# Altium PCB Power_MUX_PCB.PcbDoc (part 2 of 2)
Units mm, origin at the board's own origin, x right, y up, seen from the top; angles counter-clockwise.
Board outline 240.97 x 124.5 mm, 4 copper layers (Top Layer, Layer2_GND, Layer3_Inner, Bottom Layer 1), stack 1.548 mm thick; 112 components, 60 nets, 297 pads, 576 vias.
Unrouted connection lines stored in the file: 2.
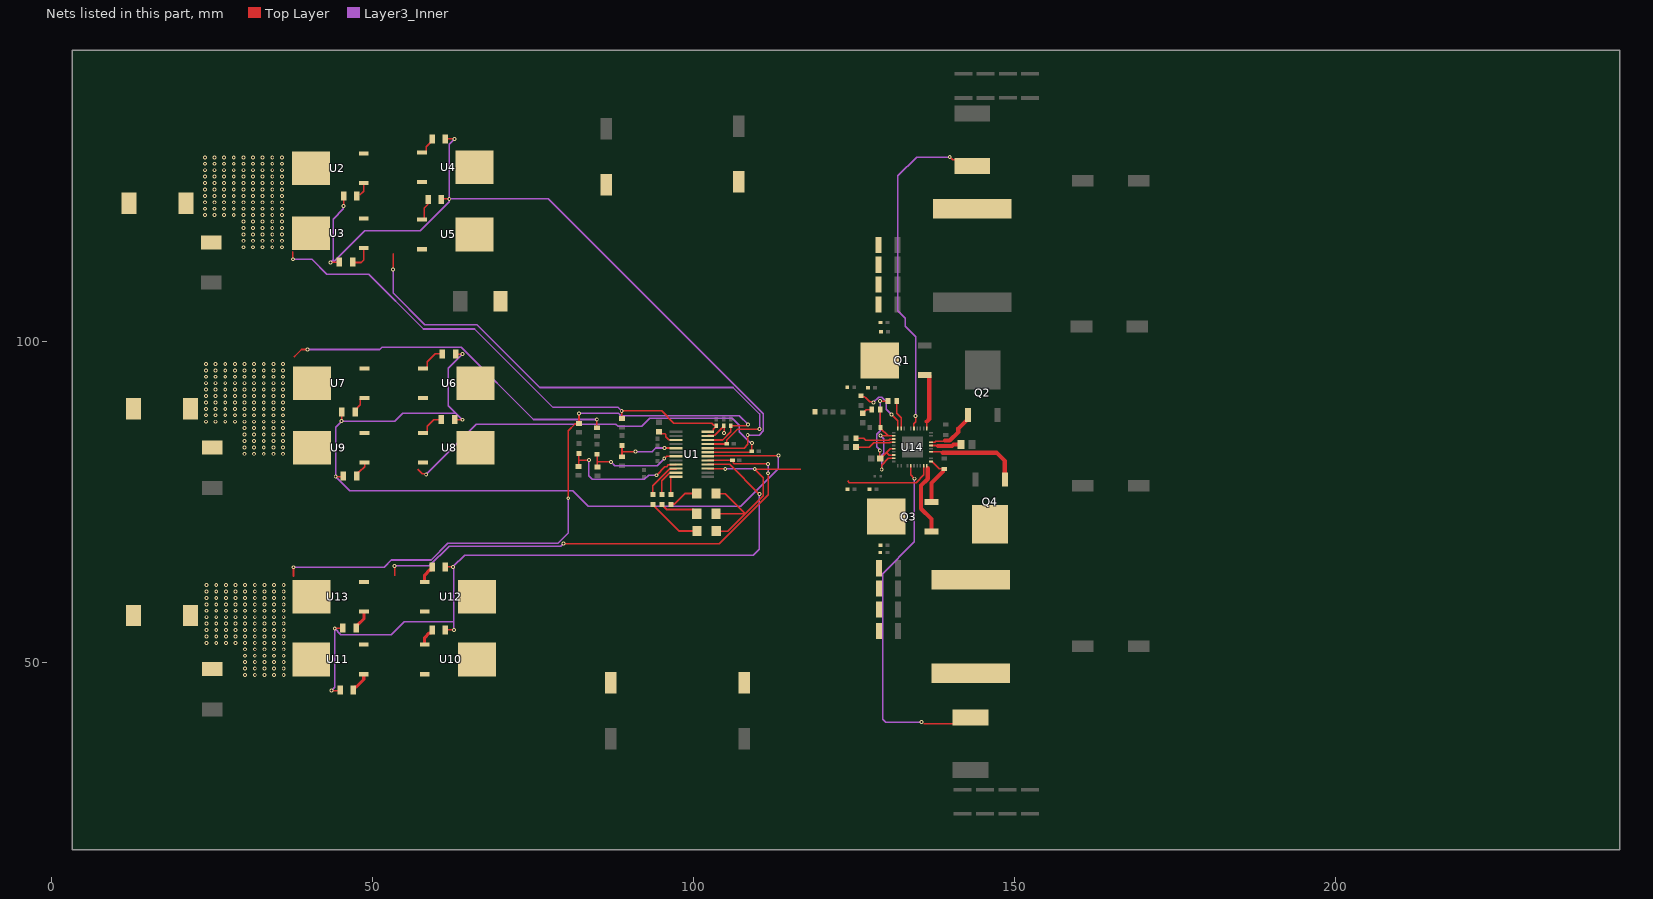
[diagram p4: the nets of this part, all layers, seen from the top]

## Via types
v1: diameter 0.6, hole 0.3, Top Layer to Bottom Layer 1, 567 vias
v2: diameter 0.6, hole 0.3, Top Layer to Bottom Layer 1, tented both sides, 9 vias

## Nets (pads, with @x,y where several pads share a name; then routed paths per layer and width w, separated by ;. In a path a pad name is that pad's centre, name@x,y a point inside that pad or via, vN(x,y) a via of type N, cw(c..) or ccw(c..) an arc to the next point about the centre after c; other vN are vias at no path point) (continued)
NetC_BOOT2_2: C_BOOT2.2 L2.1 Q3.3 Q4.2 U14.10 | length 8
  Top Layer w0.2: U14.10@136.999,81.3 137.174,81.3 138.273,80.201 138.995,80.201 C_BOOT2.2@139.074,80.122
  Top Layer w0.65: Q3.3@137.067,75.025 137.067,77.969 138.849,79.75
NetC_COMP_1: C_COMP.1 R_COMP.1 | length 1.7
  Top Layer w0.2: C_COMP.1@126.374,88.799 126.374,88.824 126.924,89.375 R_COMP.1@127.775,89.375
NetC_HF_1: C_HF.1 R_COMP.2 U14.28 U14.35 | length 15.3
  Top Layer w0.2: v1(129.124,85.325) 129.149,85.3 130.329,85.3 ; R_COMP.2@129.126,89.37 129.126,86.503 130.329,85.3 ; v1(129.324,80.05) 129.324,80.751 130.372,81.8 U14.35@131.199,81.8 ; U14.28@131.199,85.3 130.329,85.3
  Layer3_Inner w0.2: v1(129.124,85.325) 129.628,84.821 129.628,82.588 129.324,82.283 v1(129.324,80.05)
NetC_VCC_2: C_VCC.2 U14.14 | length 4.7
  Top Layer w0.25: U14.14@136.999,83.8 138.024,83.8
  Top Layer w0.65: 138.104,83.719 140.268,83.719 140.499,83.95 C_VCC.2@141.698,83.95
NetC_VS1_1: C_VS1.1 U1.21 U2.3 U3.3 U4.3 U5.3 | length 82.7
  Top Layer w0.254: v1(53.225,111.2) 53.225,113.625 ; U1.21@102.214,84.013 102.233,84.031 105.186,84.031 C_VS1.1@105.204,84.05 105.204,84.651 106.904,86.35 v1(110.3,86.35)
  Layer3_Inner w0.254: v1(53.225,111.2) 53.225,107.55 58.15,102.625 66.275,102.625 76.075,92.825 106.175,92.825 110.3,88.7 v1(110.3,86.35)
NetC_VS2_1: C_VS2.1 U1.19 U6.3 U7.3 U8.3 U9.3 | length 66.7
  Top Layer w0.2: 57.075,80.075 57.775,79.375 58.3,79.375 v1(58.375,79.3) ; U1.19@102.214,82.743 108.841,82.743 109.024,82.925 C_VS2.1@109.1,82.925 109.121,82.946 v1(109.121,84.2)
  Layer3_Inner w0.2: v1(58.375,79.3) 66.192,87.117 87.897,87.117 88.256,86.758 91.985,86.758 93.226,88 106.043,88 107.122,86.921 107.122,85.904 108.75,84.277 109.044,84.277 v1(109.121,84.2)
NetC_VS3_1: C_VS3.1 U1.17 U10.3 U11.3 U12.3 U13.3 | length 78.9
  Top Layer w0.2: v1(53.425,65.025) 53.45,65 53.45,63.525 ; v1(79.756,68.519) 103.983,68.519 111.625,76.161 v1(111.625,79.475) ; U1.17@102.214,81.473 102.228,81.486 106.066,81.486 C_VS3.1@106.079,81.5 106.186,81.394 106.186,81.096 106.361,80.921 111.621,80.921 v1(111.625,80.925)
  Layer3_Inner w0.2: v1(53.425,65.025) 58.831,65.025 61.928,68.122 79.305,68.122 79.702,68.519 v1(79.756,68.519) ; v1(111.625,79.475) v1(111.625,80.925)
NetD5_2: D5.2 R10.2 | length 8.6
  Top Layer w0.3: R10.2@93.675,74.596 93.697,74.596 97.819,70.475 D5.2@100.58,70.475
NetD6_2: D6.2 R11.2 | length 6.1
  Top Layer w0.3: R11.2@95.075,74.596 95.097,74.596 95.868,73.825 99.95,73.825 100.51,73.265 D6.2@100.51,73.175
NetD7_2: D7.2 R12.2 | length 4.7
  Top Layer w0.3: R12.2@96.5,74.596 96.579,74.675 97.045,74.675 98.67,76.3 D7.2@100.51,76.3
NetF1_1: F1.1
NetF2_1: F2.1
NetF3_1: F3.1
NetL1_2: L1.2 RS1.2 U14.22 | length 53.6
  Top Layer w0.2: U14.22@134.349,86.45 134.349,87.214 134.599,87.464 v1(134.599,88.4) ; v1@139.949,128.725 139.949,128.7 140.353,128.295 142.428,128.295 RS1.2@143.413,128.295
  Layer3_Inner w0.2: v1(134.599,88.4) 134.599,100.761 132.995,102.365 132.995,103.63 131.824,104.801 131.824,125.774 134.775,128.725 v1(139.924,128.725)
NetL2_2: L2.2 RS2.2 U14.4 | length 52.9
  Top Layer w0.2: U14.4@133.849,80.65 133.849,79.2 v1(134.424,78.625) ; 135.841,40.45 RS2.2@140.775,40.45
  Layer3_Inner w0.2: v1(134.424,78.625) 134.424,68.799 129.474,63.849 129.474,41.175 129.949,40.7 v1(135.524,40.7)
NetQ1_1: Q1.1 U14.18 | length 9.1
  Top Layer w0.25: U14.18@136.349,86.45 136.349,87.525
  Top Layer w0.65: Q1.1@136.017,94.75 136.579,94.75 136.724,94.605 136.724,87.9 136.349,87.525
NetQ2_1: Q2.1 U14.15 | length 8.2
  Top Layer w0.25: U14.15@136.999,84.3 137.604,84.3 137.754,84.45 139.054,84.45 139.174,84.569
  Top Layer w0.65: 139.174,84.569 139.916,84.569 141.26,85.913 141.26,86.438 142.749,87.927 Q2.1@142.749,88.531
NetQ3_1: Q3.1 U14.9 | length 10.9
  Top Layer w0.65: 136.499,80.25 136.499,78.602 135.469,77.572 135.469,73.94 137.067,72.341 Q3.1@137.067,70.425
NetQ4_1: Q4.1 U14.12 | length 14.9
  Top Layer w0.25: U14.12@136.999,82.8 138.699,82.8 138.824,82.675
  Top Layer w0.65: 138.824,82.675 147.199,82.675 148.499,81.375 Q4.1@148.499,78.519
NetR1_2: R1.2 R2.2 U1.5 | length 10.9
  Top Layer w0.2: 88.85,82.909 88.909,82.85 v1(90.95,82.85)
  Top Layer w0.3: R1.2@88.85,82.049 88.85,82.909 R2.2@88.85,83.769 R2.2@88.885,83.735 ; v1(95.475,83.4) 95.486,83.389 97.275,83.389 U1.5@97.286,83.378
  Layer3_Inner w0.25: v1(90.95,82.85) 93.596,82.85 93.863,83.118 ; 93.581,82.836 93.863,83.118 ; v1(95.475,83.4) 94.146,83.4 93.863,83.118
NetR4_2: R4.2 R5.2 U1.7 | length 15.2
  Top Layer w0.2: v1(95.45,81.75) 95.488,81.75 95.846,82.108 U1.7@97.286,82.108
  Top Layer w0.25: R5.2@85,82.422 85,81.3 ; R4.2@85.05,80.449 85,80.499 85,81.3 ; v1(87.15,81.25) 85.05,81.25 85,81.3
  Layer3_Inner w0.25: v1(87.15,81.25) 87.746,80.654 94.354,80.654 v1(95.45,81.75)
NetR7_2: R7.2 R8.2 U1.9 | length 20.9
  Top Layer w0.2: R7.2@82.125,80.524 82.15,80.549 82.15,81.559 ; R8.2@82.15,82.569 82.15,81.559 ; v1(83.725,81.525) 82.184,81.525 82.15,81.559 ; v1(94.257,79.162) 95.568,80.472 95.81,80.472 96.097,80.76 97.208,80.76 U1.9@97.286,80.838
  Layer3_Inner w0.2: v1(83.725,81.525) 83.725,79.05 84.25,78.525 92.367,78.525 93.003,79.162 v1(94.257,79.162)
NetR10_1: R10.1 U1.10 | length 6.1
  Top Layer w0.2: R10.1@93.675,76.152 93.675,77.525 94.9,78.75 94.9,78.774 96.251,80.125 97.208,80.125 U1.10@97.286,80.203
NetR11_1: R11.1 U1.11 | length 4.9
  Top Layer w0.2: R11.1@95.075,76.151 95.075,78.314 96.251,79.49 97.208,79.49 U1.11@97.286,79.568
NetR12_1: R12.1 U1.12 | length 3.5
  Top Layer w0.2: R12.1@96.5,76.152 96.5,78.855 96.578,78.933 U1.12@97.286,78.933
NetR13_1: R13.1 U3.1 | length 3.8
  Top Layer w0.25: R13.1@46.946,112.35 46.996,112.3 48.244,112.3 48.625,112.681 U3.1@48.625,114.575 ; U3.1@48.625,114.575 U3.1@48.7,114.575
NetR13_2: R13.2 R14.2 R15.2 R16.2 U1.20 | length 123.9
  Top Layer w0.2: v1(43.45,112.325) 44.824,112.325 R13.2@44.849,112.35 ; v1(45.5,121.1) 45.5,122.651 R14.2@45.524,122.675 ; R16.2@60.752,122.1 60.852,122.2 v1(61.975,122.2) ; R15.2@61.376,131.55 v1(62.8,131.55) ; U1.20@102.214,83.378 107.877,83.378 108.45,83.95 v1(108.45,85.425)
  Layer3_Inner w0.2: v1(45.5,121.1) 45.482,121.082 45.482,120.669 43.863,119.05 43.863,112.738 v1(43.45,112.325) 43.863,112.325 48.801,117.263 57.451,117.263 61.957,121.769 v1@61.957,122.182 ; v1(62.8,131.55) 61.975,130.725 v1(61.975,122.2) 77.404,122.2 110.9,88.704 110.9,86.101 110.224,85.425 v1(108.45,85.425)
NetR14_1: R14.1 U2.1 | length 2.1
  Top Layer w0.25: 48.075,122.85 48.625,123.4 U2.1@48.625,124.675
NetR15_1: R15.1 U4.1 | length 3
  Top Layer w0.2: U4.1@57.725,129.425 58.155,129.425 58.381,129.65 58.381,130.337 59.324,131.281 R15.1@59.324,131.55
NetR16_1: R16.1 U5.1 | length 2.6
  Top Layer w0.25: U5.1@58.072,118.975 58.072,120.797 58.6,121.325
NetR17_1: R17.1 U9.1 | length 2.6
  Top Layer w0.2: R17.1@47.526,79.075 47.526,79.344 47.855,79.674 47.949,79.674 48.775,80.5 U9.1@48.775,81.125
NetR17_2: R17.2 R18.2 R19.2 R20.2 U1.18 | length 130.8
  Top Layer w0.2: v1(44.275,78.95) 45.349,78.95 R17.2@45.474,79.075 ; v1(45.2,87.6) 45.2,88.976 R18.2@45.249,89.025 ; R20.2@62.801,87.825 62.826,87.8 v1(64.025,87.8) ; R19.2@62.951,98.075 63.001,98.025 v1(64.025,98.025) ; U1.18@102.214,82.108 102.273,82.166 113.166,82.166 v1(113.225,82.225)
  Layer3_Inner w0.2: v1(64.025,87.8) 63.001,88.824 ; v1(64.025,98.025) 61.825,95.825 61.825,90 63.001,88.824 ; v1(113.225,82.225) 113.225,80.2 107.349,74.324 83.633,74.324 81.182,76.775 46.45,76.775 v1(44.275,78.95) 44.275,86.675 v1(45.2,87.6) 53.489,87.6 54.712,88.824 63.001,88.824
NetR18_1: R18.1 U7.1 | length 3
  Top Layer w0.2: R18.1@47.301,89.025 47.301,89.295 48.119,90.113 48.119,90.975 48.345,91.2 U7.1@48.775,91.2
NetR19_1: R19.1 U6.1 | length 4.4
  Top Layer w0.2: U6.1@57.875,95.8 58.305,95.8 58.531,96.025 58.531,96.806 59.8,98.075 R19.1@60.899,98.075
NetR20_1: R20.1 U8.1 | length 4.2
  Top Layer w0.2: U8.1@57.875,85.725 58.305,85.725 58.531,85.95 58.531,86.756 59.55,87.775 60.699,87.775 R20.1@60.749,87.825
NetR21_1: R21.1 U13.1 | length 3.1
  Top Layer w0.5: R21.1@47.451,55.35 47.451,55.62 47.63,55.799 47.649,55.799 48.7,56.85 U13.1@48.7,57.925
NetR21_2: R21.2 R22.2 R23.2 R24.2 U1.16 | length 112.2
  Top Layer w0.2: v1(43.625,45.625) 44.873,45.625 R22.2@44.973,45.725 ; v1(44.125,55.3) 45.349,55.3 R21.2@45.399,55.35 ; R23.2@61.352,55.05 61.377,55.075 v1(62.7,55.075) ; R24.2@61.376,64.875 v1(62.525,64.875) ; U1.16@102.214,80.838 105.662,80.838 v1(110.275,76.225)
  Layer3_Inner w0.2: v1(43.625,45.625) v1(43.625,45.625) 44.125,46.127 v1(44.125,55.3) 45.073,54.352 52.96,54.352 54.922,56.313 62.7,56.313 ; v1(62.7,55.075) 62.7,56.313 ; v1(110.275,76.225) 110.275,67.65 109.35,66.725 64.375,66.725 v1(62.525,64.875) 62.525,64.767 62.7,64.592 62.7,56.313
NetR22_1: R22.1 U11.1 | length 3.3
  Top Layer w0.5: R22.1@47.025,45.725 47.025,45.994 47.204,46.173 47.474,46.173 48.65,47.35 U11.1@48.65,48.175
NetR23_1: R23.1 U10.1 | length 2.9
  Top Layer w0.5: U10.1@58.125,52.775 58.125,53.85 58.876,54.601 59.121,54.601 59.3,54.781 R23.1@59.3,55.05
NetR24_1: R24.1 U12.1 | length 3
  Top Layer w0.5: U12.1@58.125,62.525 58.125,63.6 58.951,64.427 59.145,64.427 59.324,64.606 R24.1@59.324,64.875
NetR_CFNG_2: R_CFNG.2 U14.26 | length 9.9
  Top Layer w0.2: R_CFNG.2@126.1,91.553 126.229,91.424 126.624,91.424 126.8,91.248 127.472,90.577 127.948,90.577 v1(128.025,90.5) ; v1(130.865,88.621) 131.849,87.637 U14.26@131.849,86.45
  Layer3_Inner w0.2: v1(128.025,90.5) 128.025,90.525 128.825,91.325 129.322,91.325 130.055,90.592 130.055,89.43 v1(130.865,88.621)
NetR_FB_1: R_FB.1 U14.25 | length 4.6
  Top Layer w0.2: R_FB.1@131.647,90.75 131.647,88.854 132.349,88.152 U14.25@132.349,86.45
NetR_HYS_2: R_HYS.2 U1.3 | length 3.4
  Top Layer w0.25: R_HYS.2@94.65,85.9 94.932,85.619 95.556,85.619 95.674,85.501 95.674,85.155 96.154,84.675 97.258,84.675 U1.3@97.286,84.648
NetR_RT_1: R_RT.1 U14.30 | length 6.2
  Top Layer w0.2: R_RT.1@125.323,83.55 127.374,83.55 128.068,84.244 130.613,84.244 130.669,84.3 U14.30@131.199,84.3
NetR_SS_2: R_SS.2 U14.29 | length 6.1
  Top Layer w0.2: R_SS.2@125.301,84.925 126.524,84.925 126.804,84.644 130.448,84.644 130.603,84.8 U14.29@131.199,84.8
VBAT1: CV1.2 D1.1 F1.2 R3.2 U1.24 U2.2 U3.2 | length 81
  Top Layer w0.2: v1(88.825,89.175) 95.053,89.175 96.953,87.275 102.848,87.275 103.157,86.967 103.454,86.967 CV1.2@103.56,86.86 103.56,86.784 103.104,86.328 103.104,85.995 103.027,85.918 U1.24@102.214,85.918
  Top Layer w0.254: 37.6,113.975 37.6,112.825 v1(37.625,112.8) ; v1(88.825,89.175) 88.825,88.023 R3.2@88.85,87.998
  Layer3_Inner w0.254: v1(37.625,112.8) 40.575,112.8 42.9,110.475 49.425,110.475 57.95,101.95 65.9,101.95 78.125,89.725 88.275,89.725 v1(88.825,89.175)
  other v1: 29.9,114.675 31.4,114.675 32.9,114.675 34.4,114.675 35.9,114.675 29.9,115.675 31.4,115.675 32.9,115.675 34.4,115.675 35.9,115.675 29.9,116.675 31.4,116.675 32.9,116.675 34.4,116.675 35.9,116.675 29.9,117.675 31.4,117.675 32.9,117.675 34.4,117.675 35.9,117.675 29.9,118.675 31.4,118.675 32.9,118.675 34.4,118.675 35.9,118.675 23.9,119.675 25.4,119.675 26.9,119.675 28.4,119.675 29.9,119.675 31.4,119.675 32.9,119.675 34.4,119.675 35.9,119.675 23.9,120.675 25.4,120.675 26.9,120.675 28.4,120.675 29.9,120.675 31.4,120.675 32.9,120.675 34.4,120.675 35.9,120.675 23.9,121.675 25.4,121.675 26.9,121.675 28.4,121.675 29.9,121.675 31.4,121.675 32.9,121.675 34.4,121.675 35.9,121.675 23.9,122.675 25.4,122.675 26.9,122.675 28.4,122.675 29.9,122.675 31.4,122.675 32.9,122.675 34.4,122.675 35.9,122.675 23.9,123.675 25.4,123.675 26.9,123.675 28.4,123.675 29.9,123.675 31.4,123.675 32.9,123.675 34.4,123.675 35.9,123.675 23.9,124.675 25.4,124.675 26.9,124.675 28.4,124.675 29.9,124.675 31.4,124.675 32.9,124.675 34.4,124.675 35.9,124.675 23.9,125.675 25.4,125.675 26.9,125.675 28.4,125.675 29.9,125.675 31.4,125.675 32.9,125.675 34.4,125.675 35.9,125.675 23.9,126.675 25.4,126.675 26.9,126.675 28.4,126.675 29.9,126.675 31.4,126.675 32.9,126.675 34.4,126.675 35.9,126.675 23.9,127.675 25.4,127.675 26.9,127.675 28.4,127.675 29.9,127.675 31.4,127.675 32.9,127.675 34.4,127.675 35.9,127.675 23.9,128.675 25.4,128.675 26.9,128.675 28.4,128.675 29.9,128.675 31.4,128.675 32.9,128.675 34.4,128.675 35.9,128.675
VBAT2: CV2.2 D2.1 F2.2 R6.2 U1.23 U7.2 U9.2 | length 58.1
  Top Layer w0.2: U1.23@102.214,85.283 102.292,85.36 103.326,85.36 104.571,86.605 104.571,86.7 CV2.2@104.75,86.879 104.762,86.867 104.762,85.763 v1(104.775,85.75)
  Top Layer w0.254: 37.85,97.65 38.95,98.75 v1(39.9,98.75) ; v1(84.95,87.85) 84.95,86.623 R6.2@85,86.573
  Layer3_Inner w0.254: v1(39.9,98.75) 51.125,98.75 51.475,99.101 63.836,99.101 75.087,87.85 v1(84.95,87.85)
  other v1: 30.075,82.5 31.575,82.5 33.075,82.5 34.575,82.5 36.075,82.5 30.075,83.5 31.575,83.5 33.075,83.5 34.575,83.5 36.075,83.5 30.075,84.5 31.575,84.5 33.075,84.5 34.575,84.5 36.075,84.5 30.075,85.5 31.575,85.5 33.075,85.5 34.575,85.5 36.075,85.5 30.075,86.5 31.575,86.5 33.075,86.5 34.575,86.5 36.075,86.5 24.075,87.5 25.575,87.5 27.075,87.5 28.575,87.5 30.075,87.5 31.575,87.5 33.075,87.5 34.575,87.5 36.075,87.5 24.075,88.5 25.575,88.5 27.075,88.5 28.575,88.5 30.075,88.5 31.575,88.5 33.075,88.5 34.575,88.5 36.075,88.5 24.075,89.5 25.575,89.5 27.075,89.5 28.575,89.5 30.075,89.5 31.575,89.5 33.075,89.5 34.575,89.5 36.075,89.5 24.075,90.5 25.575,90.5 27.075,90.5 28.575,90.5 30.075,90.5 31.575,90.5 33.075,90.5 34.575,90.5 36.075,90.5 24.075,91.5 25.575,91.5 27.075,91.5 28.575,91.5 30.075,91.5 31.575,91.5 33.075,91.5 34.575,91.5 36.075,91.5 24.075,92.5 25.575,92.5 27.075,92.5 28.575,92.5 30.075,92.5 31.575,92.5 33.075,92.5 34.575,92.5 36.075,92.5 24.075,93.5 25.575,93.5 27.075,93.5 28.575,93.5 30.075,93.5 31.575,93.5 33.075,93.5 34.575,93.5 36.075,93.5 24.075,94.5 25.575,94.5 27.075,94.5 28.575,94.5 30.075,94.5 31.575,94.5 33.075,94.5 34.575,94.5 36.075,94.5 24.075,95.5 25.575,95.5 27.075,95.5 28.575,95.5 30.075,95.5 31.575,95.5 33.075,95.5 34.575,95.5 36.075,95.5 24.075,96.5 25.575,96.5 27.075,96.5 28.575,96.5 30.075,96.5 31.575,96.5 33.075,96.5 34.575,96.5 36.075,96.5
VBAT3: CV3.2 D3.1 F3.2 R9.2 U1.22 U11.2 U13.2 | length 101
  Top Layer w0.254: 37.7,63.475 v1(37.7,64.825) ; v1(80.5,75.575) 80.5,86.099 81.545,87.144 82.071,87.144 R9.2@82.15,87.223 82.175,87.248 v1(82.175,88.8) ; U1.22@102.214,84.648 104.559,84.648 105.825,85.913 CV3.2@105.825,86.879 108.261,86.879 108.431,87.05 v1(108.525,87.05)
  Layer3_Inner w0.254: v1(37.7,64.825) 51.825,64.825 52.95,65.95 59.152,65.95 61.751,68.549 78.899,68.549 80.5,70.15 v1(80.5,75.575) ; v1(82.175,88.8) 88.313,88.8 88.686,88.427 107.148,88.427 v1(108.525,87.05)
  other v1: 30.175,48.05 31.675,48.05 33.175,48.05 34.675,48.05 36.175,48.05 30.175,49.05 31.675,49.05 33.175,49.05 34.675,49.05 36.175,49.05 30.175,50.05 31.675,50.05 33.175,50.05 34.675,50.05 36.175,50.05 30.175,51.05 31.675,51.05 33.175,51.05 34.675,51.05 36.175,51.05 30.175,52.05 31.675,52.05 33.175,52.05 34.675,52.05 36.175,52.05 24.175,53.05 25.675,53.05 27.175,53.05 28.675,53.05 30.175,53.05 31.675,53.05 33.175,53.05 34.675,53.05 36.175,53.05 24.175,54.05 25.675,54.05 27.175,54.05 28.675,54.05 30.175,54.05 31.675,54.05 33.175,54.05 34.675,54.05 36.175,54.05 24.175,55.05 25.675,55.05 27.175,55.05 28.675,55.05 30.175,55.05 31.675,55.05 33.175,55.05 34.675,55.05 36.175,55.05 24.175,56.05 25.675,56.05 27.175,56.05 28.675,56.05 30.175,56.05 31.675,56.05 33.175,56.05 34.675,56.05 36.175,56.05 24.175,57.05 25.675,57.05 27.175,57.05 28.675,57.05 30.175,57.05 31.675,57.05 33.175,57.05 34.675,57.05 36.175,57.05 24.175,58.05 25.675,58.05 27.175,58.05 28.675,58.05 30.175,58.05 31.675,58.05 33.175,58.05 34.675,58.05 36.175,58.05 24.175,59.05 25.675,59.05 27.175,59.05 28.675,59.05 30.175,59.05 31.675,59.05 33.175,59.05 34.675,59.05 36.175,59.05 24.175,60.05 25.675,60.05 27.175,60.05 28.675,60.05 30.175,60.05 31.675,60.05 33.175,60.05 34.675,60.05 36.175,60.05 24.175,61.05 25.675,61.05 27.175,61.05 28.675,61.05 30.175,61.05 31.675,61.05 33.175,61.05 34.675,61.05 36.175,61.05 24.175,62.05 25.675,62.05 27.175,62.05 28.675,62.05 30.175,62.05 31.675,62.05 33.175,62.05 34.675,62.05 36.175,62.05
VBUS: C4.1 C5.1 C6.1 C7.1 C20.2 C21.2 C22.2 C23.2 C24.1 C25.1 C26.1 C27.1 C28.1 C29.1 C30.1 C31.1 C32.2 C33.2 C34.2 C35.2 D4.1 D5.1 D6.1 D7.1 Q1.2 Q3.2 R26.2 U1.15 U4.2 U5.2 U6.2 U8.2 U10.2 U12.2 U14.8 | length 53.2
  Top Layer w0.2: U1.15@102.214,80.203 102.24,80.176 104.924,80.176 v1(104.95,80.15) ; D6.1@103.49,73.175 108.074,73.175 ; D7.1@103.49,76.3 104.949,76.3 108.074,73.175 ; D5.1@103.56,70.475 105.374,70.475 108.074,73.175 ; 116.75,80.125 v1(109.55,80.125) 110.875,78.8 110.875,75.976 108.074,73.175 ; 124,78.275 124.25,78.025 134.672,78.025 135.849,79.201 U14.8@135.849,80.65
  Layer3_Inner w0.2: v1(104.95,80.15) 104.963,80.138 109.537,80.138 v1(109.55,80.125)
VDDA: C_VDDA.1 R_FB.2 U14.32 U14.34 | length 14.7
  Top Layer w0.2: v1(129.028,83.025) 129.028,81.842 C_VDDA.1@129.124,81.746 129.149,81.746 129.524,82.121 129.524,82.146 130.1,82.723 ; v1(129.074,90.725) 130.275,90.725 R_FB.2@130.3,90.75 ; U14.34@131.199,82.3 130.499,82.3 130.1,82.698 130.1,82.723 ; U14.32@131.199,83.3 130.677,83.3 130.1,82.723
  Layer3_Inner w0.2: v1(129.028,83.025) 129.028,83.096 128.524,83.6 128.524,85.574 128.825,85.875 128.872,85.875 129.074,86.077 v1(129.074,90.725)
pads on no net: U1.1 U1.2 U1.14 U14.5 U14.21 U14.33

## Polygon pours and split planes (outlines as drawn)
GND on Top Layer "NONET_L-01_P-001" (solid, pour order 130): 170.525,51.545 170.525,50.526 173.25,50.526 173.25,51.525 173.25,54.475 170.525,54.475 170.525,53.452 170.194,53.452 170.194,51.547
GND on Top Layer "NONET_L-01_P-001" (solid, pour order 129): 170.525,76.545 170.525,75.526 173.25,75.526 173.25,76.525 173.25,79.475 170.525,79.475 170.525,78.452 170.194,78.452 170.194,76.547
GND on Top Layer "NONET_L-01_P-001" (solid, pour order 128): 170.3,101.37 170.3,100.351 173.025,100.351 173.025,101.35 173.025,104.3 170.3,104.3 170.3,103.277 169.969,103.277 169.969,101.372
GND on Top Layer "NONET_L-01_P-001" (solid, pour order 127): 170.525,124.045 170.525,123.026 173.25,123.026 173.25,124.025 173.25,126.975 170.525,126.975 170.525,125.952 170.194,125.952 170.194,124.047
VBUS on Top Layer "VBUS" (solid, pour order 91): 127.255,93.029 127.509,93.029 127.509,92.521 126.779,92.521 125.925,93.375 124.05,93.375 124.05,76.3 126.525,76.3 126.525,77.35 127.48,77.35 127.48,77.229 127.734,77.229 127.734,76.721 127.48,76.721 127.48,76.3 133,76.3 133,69.25 129.25,69.25 129.25,44.9 68.525,44.9 68.4,44.775 68.4,130.325 68.35,130.375 129.25,130.47 129.25,100.625 132,100.625 132,93.7 126.3,93.7 126.625,93.375 127.255,93.375
GND on Top Layer "NONET_L-01_P-001" (solid, pour order 126): 153.822,141.4 151.028,141.4 151.025,141.403 151.025,143.3 153.8,143.3 153.822,143.278
GND on Top Layer "NONET_L-01_P-001" (solid, pour order 122): 143.472,141.4 140.678,141.4 140.675,141.403 140.675,143.3 143.45,143.3 143.472,143.278
GND on Top Layer "NONET_L-01_P-001" (solid, pour order 123): 146.922,141.4 144.128,141.4 144.125,141.403 144.125,143.3 146.9,143.3 146.922,143.278
GND on Top Layer "NONET_L-01_P-001" (solid, pour order 124): 150.372,141.425 147.578,141.425 147.575,141.428 147.575,143.325 150.35,143.325 150.372,143.303
GND on Top Layer "NONET_L-01_P-001" (solid, pour order 121): 151.053,26.7 153.847,26.7 153.85,26.697 153.85,24.8 151.075,24.8 151.053,24.822
GND on Top Layer "NONET_L-01_P-001" (solid, pour order 120): 147.528,26.7 150.322,26.7 150.325,26.697 150.325,24.8 147.55,24.8 147.528,24.822
GND on Top Layer "NONET_L-01_P-001" (solid, pour order 119): 144.003,26.7 146.797,26.7 146.8,26.697 146.8,24.8 144.025,24.8 144.003,24.822
GND on Top Layer "NONET_L-01_P-001" (solid, pour order 118): 140.478,26.7 143.272,26.7 143.275,26.697 143.275,24.8 140.5,24.8 140.478,24.822
NetC8_2 on Top Layer "NONET_L-01_P-001" (solid, pour order 113): 147.35,135.675 147.35,125.675 154.125,125.675 154.125,43 147.225,43 147.225,33.012 147.237,33 140.375,33 140.375,30.025 161.475,30.025 161.475,138.05 140.625,138.05 140.625,135.675
NetL2_2 on Top Layer "NONET_L-01_P-001" (solid, pour order 87): 140.411,41.278 145.999,41.278 145.999,43.625 149.305,46.931 149.305,49.736 137.28,49.736 137.28,46.756 140.411,43.625
NetC_BOOT2_2 on Top Layer "NONET_L-01_P-001" (solid, pour order 81): 148.999,68.85 148.999,68.5 148.999,63.3 137.15,63.3 137.15,68.856 137.849,69.65 137.849,74.9 137.824,75.8 148.999,75.8
AGND on Top Layer "NONET_L-01_P-001" (solid, pour order 38): 128.399,78.775 128.399,90.2 123.049,90.2 123.049,78.775
GND on Top Layer "NONET_L-01_P-001" (solid, pour order 109): 86.195,36.95 85.176,36.95 85.176,34.225 86.175,34.225 89.125,34.225 89.125,36.95 88.102,36.95 88.102,37.281 86.197,37.281
GND on Top Layer "NONET_L-01_P-001" (solid, pour order 110): 106.945,36.95 105.926,36.95 105.926,34.225 106.925,34.225 109.875,34.225 109.875,36.95 108.852,36.95 108.852,37.281 106.947,37.281
NetC_VS2_1 on Top Layer "NONET_L-01_P-001" (solid, pour order 33): 49.35,79.825 49.35,82.087 49.35,90.35 49.35,92.15 49.35,96.75 57.217,96.75 57.262,86.637 57.262,84.626 57.325,84.562 57.325,79.825
VBAT2 on Top Layer "NONET_L-01_P-001" (solid, pour order 57): 28.495,84.548 28.475,84.527 28.475,80.825 32.168,80.825 38.125,80.825 38.125,97.998 22.07,97.998 22.07,85.535 23.444,84.161 26.746,84.161 26.745,84.162 26.745,84.548
GND on Top Layer "NONET_L-01_P-001" (solid, pour order 96): 23.424,78.344 26.726,78.344 26.726,76.312 26.725,76.311 26.725,72.775 23.45,72.775 23.425,72.75 23.424,72.751
GND on Top Layer "NONET_L-01_P-001" (solid, pour order 108): 107.98,134.725 108.999,134.725 108.999,137.45 108,137.45 105.05,137.45 105.05,134.725 106.073,134.725 106.073,134.394 107.978,134.394
GND on Top Layer "NONET_L-01_P-001" (solid, pour order 101): 87.355,134.3 88.374,134.3 88.374,137.025 87.375,137.025 84.425,137.025 84.425,134.3 85.447,134.3 85.447,133.969 87.352,133.969
GND on Top Layer "NONET_L-01_P-001" (solid, pour order 99): 64.819,107.901 64.819,104.599 62.787,104.599 62.786,104.6 59.25,104.6 59.25,107.875 59.225,107.9 59.226,107.901
NetC_BOOT1_2 on Top Layer "NONET_L-01_P-001" (solid, pour order 75): 136.741,105.185 136.741,101.833 136.741,96.975 149.517,96.975 149.517,105.185 137.224,105.185
GND on Top Layer "NONET_L-01_P-001" (solid, pour order 83): 144.499,87.7 144.499,84.975 149.249,84.975 149.249,87.7
GND on Top Layer "NONET_L-01_P-001" (solid, pour order 84): 141.449,82.05 141.449,79.325 146.199,79.325 146.199,82.05
NetL1_2 on Top Layer "NONET_L-01_P-001" (solid, pour order 86): 137.328,122.036 137.328,119.166 137.277,119.115 149.57,119.115 149.57,121.985 146.218,125.338 146.218,127.694 146.224,127.7 140.624,127.7 140.63,126.259 140.63,125.338
VBAT1 on Top Layer "NONET_L-01_P-001" (solid, pour order 27): 28.375,116.516 28.375,113.575 31.325,113.575 37.975,113.575 37.975,130.175 21.9,130.175 21.9,117.712 23.274,116.338 26.576,116.338 26.575,116.339 26.575,116.516
VBAT3 on Top Layer "NONET_L-01_P-001" (solid, pour order 58): 28.45,50.1 28.45,47.025 31.675,47.025 37.85,47.025 38.025,47.2 38.025,63.55 22.175,63.55 22.175,51.087 23.569,49.694 26.675,49.694 26.675,50.1
GND on Top Layer "NONET_L-01_P-001" (solid, pour order 97): 23.424,43.844 26.726,43.844 26.726,41.812 26.725,41.811 26.725,38.275 23.45,38.275 23.425,38.25 23.424,38.251
GND on Top Layer "NONET_L-01_P-001" (solid, pour order 95): 23.274,110.344 26.576,110.344 26.576,108.312 26.575,108.311 26.575,104.775 23.3,104.775 23.275,104.75 23.274,104.751
NetC_VS1_1 on Top Layer "NONET_L-01_P-001" (solid, remove dead copper, pour order 25): 49.2,113.5 49.2,115.562 49.2,123.825 49.2,125.625 49.2,130.375 57.075,130.375 57.175,130.375 57.175,118.038 57.175,113.5
NetC_VS3_1 on Top Layer "NONET_L-01_P-001" (solid, pour order 89): 57.725,46.7 49.175,46.7 49.175,63.525 57.725,63.525
no net on Top Layer "NONET_L-01_P-001" (solid, shelved, pour order 64): 220.272,104.01 207.978,104.01 207.978,101.14 220.272,101.14
GND on Layer2_GND (split plane): 243.74,21.335 3.785,21.335 3.785,144.815 243.74,144.815

## Other copper
Top Layer:
  rectangle net GND: 102.9,87.775 106.5,91.625
  pour cut-out: 75.875,66.025 75.875,93.8 116.6,93.8 116.6,66.025
  text "Layer 4 copies VBAT 1-3 , VS1-3, VBUS, 12V+ output and Inductor pad 2 to RS resistors copper pours.  / Why: Heat Relief  /  / Via Arryas for each L4 Power pour everything else on L4 is GND /  / GND stitching every 5-10mm for GND copper" at 189.725,108 h1.52
  text "REMEMBER INPUT CONNECTER FOR FUSES" at 6.325,70.675 h1.52
  text "Vout to car /  / Note: My placement and routing creates some noise so not a clean 12V signal. Maybe osciliscope to see how noisy? /  / 12V out to the car: 12V 5% (11.4-12.6V), up to 29A. / Regulated at the shunt output; the drop from here to the connector is only 15mV. / 470uF caps hold 12V up when big loads (fans) switch on with a nearly empty pack." at 188.1,50.225 h1.52

## Text inside footprints (layer, text, board x,y; h text height)
L1: Top Overlay "RefDes" at 144.059,111.495 h1.27 r90; Top Overlay "REFDES" at 144.059,111.177 h1.27 r90; Mechanical 13 "RefDes2" at 144.059,111.177 h1.27 r90
L2: Top Overlay "REFDES" at 142.539,57.82 h1.27 r270; Top Overlay "RefDes" at 142.539,57.503 h1.27 r270; Mechanical 13 "RefDes2" at 142.539,57.82 h1.27 r270
Q1: Top Overlay "*" at 136.899,92.575 h1.27 r90; Mechanical 13 "*" at 134.43,94.432 h1.27 r90
Q2: Top Overlay "*" at 140.699,88.725 h1.27; Mechanical 13 "*" at 142.431,90.119 h1.27
Q3: Top Overlay "*" at 137.324,68.2 h1.27 r90; Mechanical 13 "*" at 135.48,70.108 h1.27 r90
Q4: Top Overlay "*" at 150.674,79.075 h1.27 r180; Mechanical 13 "*" at 148.816,76.931 h1.27 r180
RS1: Top Overlay "RefDes" at 142.789,133.294 h1.27 r270; Top Overlay "REFDES" at 142.789,133.612 h1.27 r270
RS2: Top Overlay "RefDes" at 143.809,35.42 h1.27 r90; Top Overlay "REFDES" at 143.809,35.103 h1.27 r90
U1: Top Overlay "*" at 95.625,86.35 h1.27; Mechanical 13 "*" at 97.82,85.448 h1.27
U2: Top Overlay "*" at 49.25,121.8 h1.27 r90; Mechanical 13 "*" at 45.406,124.358 h1.27 r90
U3: Top Overlay "*" at 50.05,112.325 h1.27 r90; Mechanical 13 "*" at 45.406,114.258 h1.27 r90
U4: Top Overlay "*" at 57.125,131.4 h1.27 r270; Mechanical 13 "*" at 60.944,129.743 h1.27 r270
U5: Top Overlay "*" at 58.403,120.875 h1.27 r270; Mechanical 13 "*" at 60.944,119.293 h1.27 r270
U6: Top Overlay "*" at 57.3,98.15 h1.27 r270; Mechanical 13 "*" at 61.094,96.117 h1.27 r270
U7: Top Overlay "*" at 49.3,89.125 h1.27 r90; Mechanical 13 "*" at 45.556,90.882 h1.27 r90
U8: Top Overlay "*" at 57.328,87.65 h1.27 r270; Mechanical 13 "*" at 61.094,86.042 h1.27 r270
U9: Top Overlay "*" at 49.35,79.175 h1.27 r90; Mechanical 13 "*" at 45.556,80.807 h1.27 r90
U10: Top Overlay "*" at 57.525,54.675 h1.27 r270; Mechanical 13 "*" at 61.344,53.092 h1.27 r270
U11: Top Overlay "*" at 49.1,45.325 h1.27 r90; Mechanical 13 "*" at 45.431,47.857 h1.27 r90
U12: Top Overlay "*" at 57.575,64.5 h1.27 r270; Mechanical 13 "*" at 61.344,62.842 h1.27 r270
U13: Top Overlay "*" at 49.3,55.875 h1.27 r90; Mechanical 13 "*" at 45.481,57.607 h1.27 r90